# Altium PCB DSP大板子.PcbDoc (part 4 of 9)
Units mil, origin at the board's own origin, x right, y up, seen from the top; angles counter-clockwise.
Board outline 7874.02 x 9055.12 mil, 4 copper layers (Top Layer, GND02, PWR03, Bottom Layer), stack 23.756 mil thick; 656 components, 360 nets, 1967 pads, 2623 vias.
Unrouted connection lines stored in the file: 70.
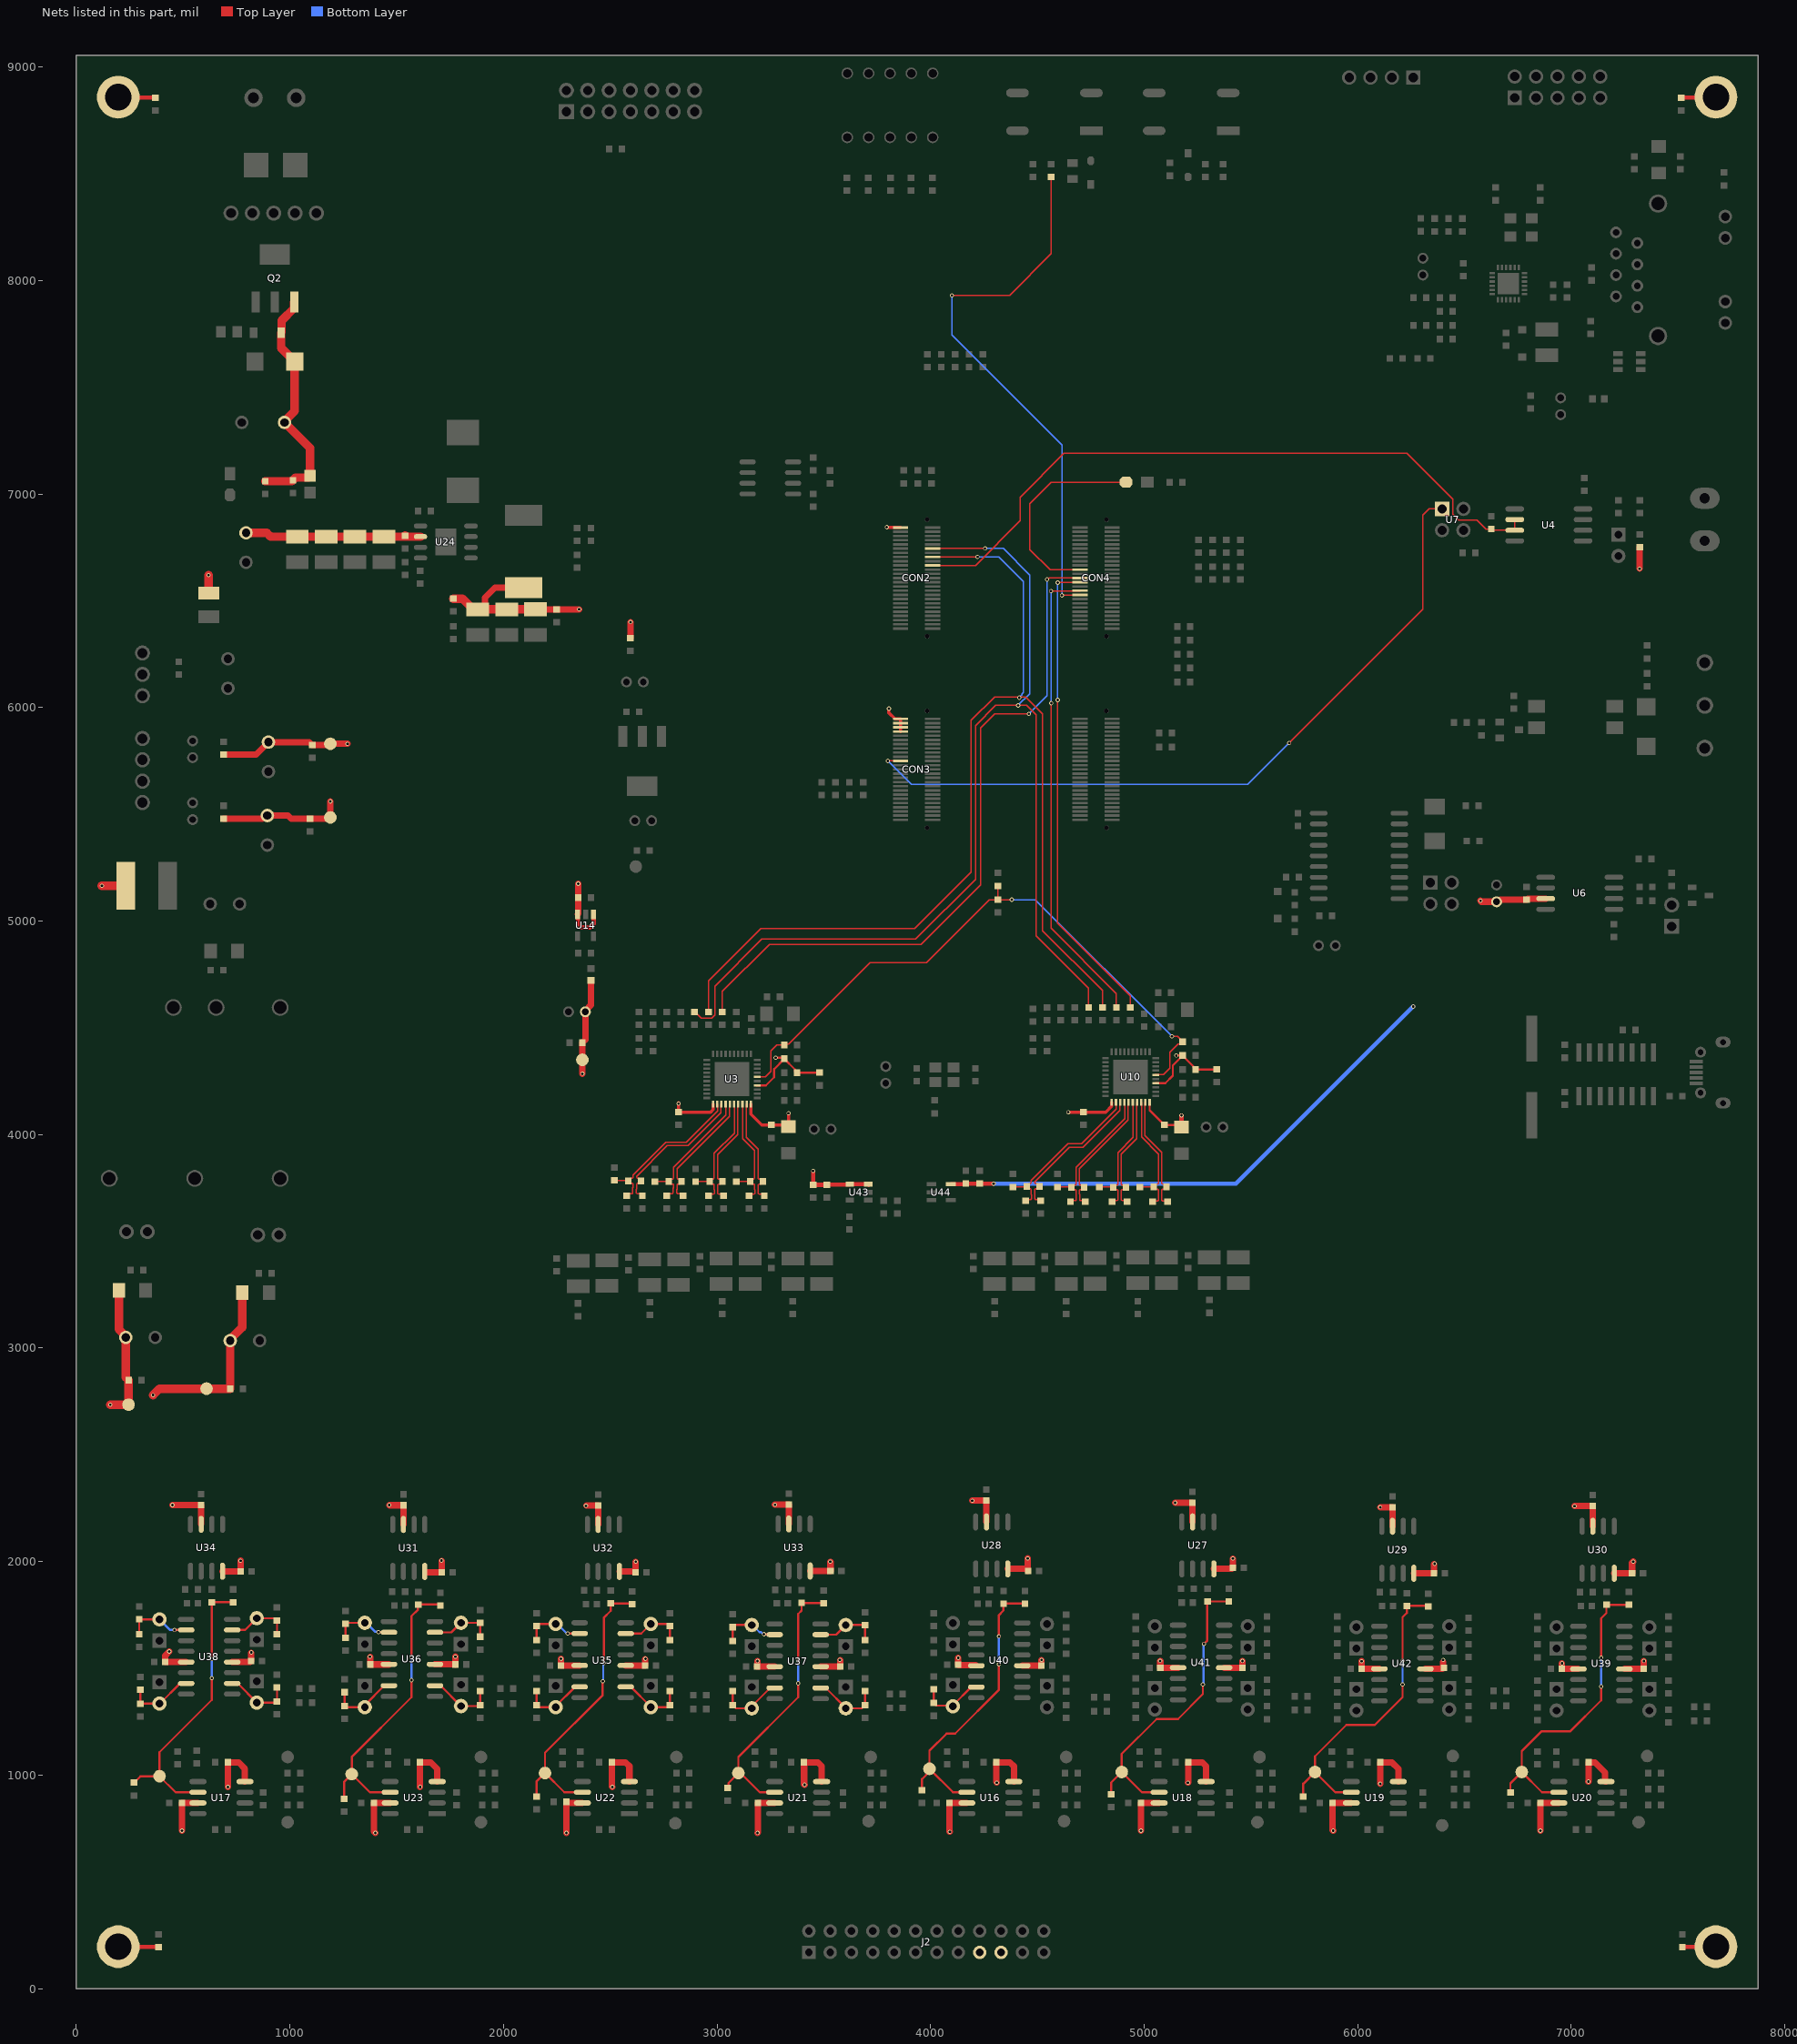
[diagram p4: the nets of this part, all layers, seen from the top]

## Part data (continued)
R1 R2 R3 R4 R5 R6 R7 R8 R9 R10 R11 R12 R13 R14 R15 R16 R17 R19 R20 R21 R22 R23 R25 R29 R30 R32 R33 R34 R35 R36 R37 R38 R (continued)
  R191: AddInBom=yes, DesignItemID=R, Device=R, FootprintName="R 0603_L", LibraryName="0.1 - 电阻-电容-电感", Origin Footprint="R 0201_L", OriginFootprint 2="R 0402_L", OriginFootprint 3="R 0805_L", OriginFootprint 4="R 1206_L", OriginFootprint 5="R 1210_L", OriginFootprint 6="R 1812_L", OriginFootprint 7="R 2010_L", OriginFootprint 8="R 2512_L", OriginFootprint 9="R 0201_M", OriginFootprint 10="R 0402_M", OriginFootprint 11="R 0603_M", OriginFootprint 12="R 0805_M", OriginFootprint 13="R 1206_M", OriginFootprint 14="R 1210_M", OriginFootprint 15="R 1812_M", OriginFootprint 16="R 2010_M", OriginFootprint 17="R 2512_M", OriginModelName="R 0603", SymbolName=R, UniqueId=e262797b4e338b99, 封装库来自淘宝卖家 ID：黄晶宝石=其他店铺购入均为盗版，不享受售后技术支持服务，请立即申请退款, 版权归属="来自淘宝 ID：黄晶宝石", 联系售后=https://shop463601444.taobao.com
  R192: AddInBom=yes, DesignItemID=R, Device=R, FootprintName="R 0603_L", LibraryName="0.1 - 电阻-电容-电感", Origin Footprint="R 0201_L", OriginFootprint 2="R 0402_L", OriginFootprint 3="R 0805_L", OriginFootprint 4="R 1206_L", OriginFootprint 5="R 1210_L", OriginFootprint 6="R 1812_L", OriginFootprint 7="R 2010_L", OriginFootprint 8="R 2512_L", OriginFootprint 9="R 0201_M", OriginFootprint 10="R 0402_M", OriginFootprint 11="R 0603_M", OriginFootprint 12="R 0805_M", OriginFootprint 13="R 1206_M", OriginFootprint 14="R 1210_M", OriginFootprint 15="R 1812_M", OriginFootprint 16="R 2010_M", OriginFootprint 17="R 2512_M", OriginModelName="R 0603", SymbolName=R, UniqueId=4edf9ccd7d55be5d, 封装库来自淘宝卖家 ID：黄晶宝石=其他店铺购入均为盗版，不享受售后技术支持服务，请立即申请退款, 版权归属="来自淘宝 ID：黄晶宝石", 联系售后=https://shop463601444.taobao.com
  R193: AddInBom=yes, DesignItemID=R, Device=R, FootprintName="R 0603_L", LibraryName="0.1 - 电阻-电容-电感", Origin Footprint="R 0201_L", OriginFootprint 2="R 0402_L", OriginFootprint 3="R 0805_L", OriginFootprint 4="R 1206_L", OriginFootprint 5="R 1210_L", OriginFootprint 6="R 1812_L", OriginFootprint 7="R 2010_L", OriginFootprint 8="R 2512_L", OriginFootprint 9="R 0201_M", OriginFootprint 10="R 0402_M", OriginFootprint 11="R 0603_M", OriginFootprint 12="R 0805_M", OriginFootprint 13="R 1206_M", OriginFootprint 14="R 1210_M", OriginFootprint 15="R 1812_M", OriginFootprint 16="R 2010_M", OriginFootprint 17="R 2512_M", OriginModelName="R 0603", SymbolName=R, UniqueId=9e0eccf13a6f31a8, 封装库来自淘宝卖家 ID：黄晶宝石=其他店铺购入均为盗版，不享受售后技术支持服务，请立即申请退款, 版权归属="来自淘宝 ID：黄晶宝石", 联系售后=https://shop463601444.taobao.com
  R194: AddInBom=yes, DesignItemID=R, Device=R, FootprintName="R 0603_L", LibraryName="0.1 - 电阻-电容-电感", Origin Footprint="R 0201_L", OriginFootprint 2="R 0402_L", OriginFootprint 3="R 0805_L", OriginFootprint 4="R 1206_L", OriginFootprint 5="R 1210_L", OriginFootprint 6="R 1812_L", OriginFootprint 7="R 2010_L", OriginFootprint 8="R 2512_L", OriginFootprint 9="R 0201_M", OriginFootprint 10="R 0402_M", OriginFootprint 11="R 0603_M", OriginFootprint 12="R 0805_M", OriginFootprint 13="R 1206_M", OriginFootprint 14="R 1210_M", OriginFootprint 15="R 1812_M", OriginFootprint 16="R 2010_M", OriginFootprint 17="R 2512_M", OriginModelName="R 0603", SymbolName=R, UniqueId=a6178234e12ca1a3, 封装库来自淘宝卖家 ID：黄晶宝石=其他店铺购入均为盗版，不享受售后技术支持服务，请立即申请退款, 版权归属="来自淘宝 ID：黄晶宝石", 联系售后=https://shop463601444.taobao.com
  R196: AddInBom=yes, DesignItemID=R, Device=R, FootprintName="R 0603_L", LibraryName="0.1 - 电阻-电容-电感", Origin Footprint="R 0201_L", OriginFootprint 2="R 0402_L", OriginFootprint 3="R 0805_L", OriginFootprint 4="R 1206_L", OriginFootprint 5="R 1210_L", OriginFootprint 6="R 1812_L", OriginFootprint 7="R 2010_L", OriginFootprint 8="R 2512_L", OriginFootprint 9="R 0201_M", OriginFootprint 10="R 0402_M", OriginFootprint 11="R 0603_M", OriginFootprint 12="R 0805_M", OriginFootprint 13="R 1206_M", OriginFootprint 14="R 1210_M", OriginFootprint 15="R 1812_M", OriginFootprint 16="R 2010_M", OriginFootprint 17="R 2512_M", OriginModelName="R 0603", SymbolName=R, UniqueId=09b823a69019dbbf, 封装库来自淘宝卖家 ID：黄晶宝石=其他店铺购入均为盗版，不享受售后技术支持服务，请立即申请退款, 版权归属="来自淘宝 ID：黄晶宝石", 联系售后=https://shop463601444.taobao.com
  R197: AddInBom=yes, DesignItemID=R, Device=R, FootprintName="R 0603_L", LibraryName="0.1 - 电阻-电容-电感", Origin Footprint="R 0201_L", OriginFootprint 2="R 0402_L", OriginFootprint 3="R 0805_L", OriginFootprint 4="R 1206_L", OriginFootprint 5="R 1210_L", OriginFootprint 6="R 1812_L", OriginFootprint 7="R 2010_L", OriginFootprint 8="R 2512_L", OriginFootprint 9="R 0201_M", OriginFootprint 10="R 0402_M", OriginFootprint 11="R 0603_M", OriginFootprint 12="R 0805_M", OriginFootprint 13="R 1206_M", OriginFootprint 14="R 1210_M", OriginFootprint 15="R 1812_M", OriginFootprint 16="R 2010_M", OriginFootprint 17="R 2512_M", OriginModelName="R 0603", SymbolName=R, UniqueId=bc27cb7a11a997be, 封装库来自淘宝卖家 ID：黄晶宝石=其他店铺购入均为盗版，不享受售后技术支持服务，请立即申请退款, 版权归属="来自淘宝 ID：黄晶宝石", 联系售后=https://shop463601444.taobao.com
  R198: AddInBom=yes, DesignItemID=R, Device=R, FootprintName="R 0603_L", LibraryName="0.1 - 电阻-电容-电感", Origin Footprint="R 0201_L", OriginFootprint 2="R 0402_L", OriginFootprint 3="R 0805_L", OriginFootprint 4="R 1206_L", OriginFootprint 5="R 1210_L", OriginFootprint 6="R 1812_L", OriginFootprint 7="R 2010_L", OriginFootprint 8="R 2512_L", OriginFootprint 9="R 0201_M", OriginFootprint 10="R 0402_M", OriginFootprint 11="R 0603_M", OriginFootprint 12="R 0805_M", OriginFootprint 13="R 1206_M", OriginFootprint 14="R 1210_M", OriginFootprint 15="R 1812_M", OriginFootprint 16="R 2010_M", OriginFootprint 17="R 2512_M", OriginModelName="R 0603", SymbolName=R, UniqueId=01fdb669dc90136a, 封装库来自淘宝卖家 ID：黄晶宝石=其他店铺购入均为盗版，不享受售后技术支持服务，请立即申请退款, 版权归属="来自淘宝 ID：黄晶宝石", 联系售后=https://shop463601444.taobao.com
  R199: AddInBom=yes, DesignItemID=R, Device=R, FootprintName="R 0603_L", LibraryName="0.1 - 电阻-电容-电感", Origin Footprint="R 0201_L", OriginFootprint 2="R 0402_L", OriginFootprint 3="R 0805_L", OriginFootprint 4="R 1206_L", OriginFootprint 5="R 1210_L", OriginFootprint 6="R 1812_L", OriginFootprint 7="R 2010_L", OriginFootprint 8="R 2512_L", OriginFootprint 9="R 0201_M", OriginFootprint 10="R 0402_M", OriginFootprint 11="R 0603_M", OriginFootprint 12="R 0805_M", OriginFootprint 13="R 1206_M", OriginFootprint 14="R 1210_M", OriginFootprint 15="R 1812_M", OriginFootprint 16="R 2010_M", OriginFootprint 17="R 2512_M", OriginModelName="R 0603", SymbolName=R, UniqueId=e4d4da7e660617df, 封装库来自淘宝卖家 ID：黄晶宝石=其他店铺购入均为盗版，不享受售后技术支持服务，请立即申请退款, 版权归属="来自淘宝 ID：黄晶宝石", 联系售后=https://shop463601444.taobao.com
  R201: AddInBom=yes, DesignItemID=R, Device=R, FootprintName="R 0603_L", LibraryName="0.1 - 电阻-电容-电感", Origin Footprint="R 0201_L", OriginFootprint 2="R 0402_L", OriginFootprint 3="R 0805_L", OriginFootprint 4="R 1206_L", OriginFootprint 5="R 1210_L", OriginFootprint 6="R 1812_L", OriginFootprint 7="R 2010_L", OriginFootprint 8="R 2512_L", OriginFootprint 9="R 0201_M", OriginFootprint 10="R 0402_M", OriginFootprint 11="R 0603_M", OriginFootprint 12="R 0805_M", OriginFootprint 13="R 1206_M", OriginFootprint 14="R 1210_M", OriginFootprint 15="R 1812_M", OriginFootprint 16="R 2010_M", OriginFootprint 17="R 2512_M", OriginModelName="R 0603", SymbolName=R, UniqueId=a6f8c12e5677218f, 封装库来自淘宝卖家 ID：黄晶宝石=其他店铺购入均为盗版，不享受售后技术支持服务，请立即申请退款, 版权归属="来自淘宝 ID：黄晶宝石", 联系售后=https://shop463601444.taobao.com
  R202: AddInBom=yes, DesignItemID=R, Device=R, FootprintName="R 0603_L", LibraryName="0.1 - 电阻-电容-电感", Origin Footprint="R 0201_L", OriginFootprint 2="R 0402_L", OriginFootprint 3="R 0805_L", OriginFootprint 4="R 1206_L", OriginFootprint 5="R 1210_L", OriginFootprint 6="R 1812_L", OriginFootprint 7="R 2010_L", OriginFootprint 8="R 2512_L", OriginFootprint 9="R 0201_M", OriginFootprint 10="R 0402_M", OriginFootprint 11="R 0603_M", OriginFootprint 12="R 0805_M", OriginFootprint 13="R 1206_M", OriginFootprint 14="R 1210_M", OriginFootprint 15="R 1812_M", OriginFootprint 16="R 2010_M", OriginFootprint 17="R 2512_M", OriginModelName="R 0603", SymbolName=R, UniqueId=da75effbc0c418b2, 封装库来自淘宝卖家 ID：黄晶宝石=其他店铺购入均为盗版，不享受售后技术支持服务，请立即申请退款, 版权归属="来自淘宝 ID：黄晶宝石", 联系售后=https://shop463601444.taobao.com
  R203: AddInBom=yes, DesignItemID=R, Device=R, FootprintName="R 0603_L", LibraryName="0.1 - 电阻-电容-电感", Origin Footprint="R 0201_L", OriginFootprint 2="R 0402_L", OriginFootprint 3="R 0805_L", OriginFootprint 4="R 1206_L", OriginFootprint 5="R 1210_L", OriginFootprint 6="R 1812_L", OriginFootprint 7="R 2010_L", OriginFootprint 8="R 2512_L", OriginFootprint 9="R 0201_M", OriginFootprint 10="R 0402_M", OriginFootprint 11="R 0603_M", OriginFootprint 12="R 0805_M", OriginFootprint 13="R 1206_M", OriginFootprint 14="R 1210_M", OriginFootprint 15="R 1812_M", OriginFootprint 16="R 2010_M", OriginFootprint 17="R 2512_M", OriginModelName="R 0603", SymbolName=R, UniqueId=41260ea8bae6dc8d, 封装库来自淘宝卖家 ID：黄晶宝石=其他店铺购入均为盗版，不享受售后技术支持服务，请立即申请退款, 版权归属="来自淘宝 ID：黄晶宝石", 联系售后=https://shop463601444.taobao.com
  R204: AddInBom=yes, DesignItemID=R, Device=R, FootprintName="R 0603_L", LibraryName="0.1 - 电阻-电容-电感", Origin Footprint="R 0201_L", OriginFootprint 2="R 0402_L", OriginFootprint 3="R 0805_L", OriginFootprint 4="R 1206_L", OriginFootprint 5="R 1210_L", OriginFootprint 6="R 1812_L", OriginFootprint 7="R 2010_L", OriginFootprint 8="R 2512_L", OriginFootprint 9="R 0201_M", OriginFootprint 10="R 0402_M", OriginFootprint 11="R 0603_M", OriginFootprint 12="R 0805_M", OriginFootprint 13="R 1206_M", OriginFootprint 14="R 1210_M", OriginFootprint 15="R 1812_M", OriginFootprint 16="R 2010_M", OriginFootprint 17="R 2512_M", OriginModelName="R 0603", SymbolName=R, UniqueId=df29ef2d077fcbbf, 封装库来自淘宝卖家 ID：黄晶宝石=其他店铺购入均为盗版，不享受售后技术支持服务，请立即申请退款, 版权归属="来自淘宝 ID：黄晶宝石", 联系售后=https://shop463601444.taobao.com
  R205: AddInBom=yes, DesignItemID=R, Device=R, FootprintName="R 0603_L", LibraryName="0.1 - 电阻-电容-电感", Origin Footprint="R 0201_L", OriginFootprint 2="R 0402_L", OriginFootprint 3="R 0805_L", OriginFootprint 4="R 1206_L", OriginFootprint 5="R 1210_L", OriginFootprint 6="R 1812_L", OriginFootprint 7="R 2010_L", OriginFootprint 8="R 2512_L", OriginFootprint 9="R 0201_M", OriginFootprint 10="R 0402_M", OriginFootprint 11="R 0603_M", OriginFootprint 12="R 0805_M", OriginFootprint 13="R 1206_M", OriginFootprint 14="R 1210_M", OriginFootprint 15="R 1812_M", OriginFootprint 16="R 2010_M", OriginFootprint 17="R 2512_M", OriginModelName="R 0603", SymbolName=R, UniqueId=e988a913e3416cdd, 封装库来自淘宝卖家 ID：黄晶宝石=其他店铺购入均为盗版，不享受售后技术支持服务，请立即申请退款, 版权归属="来自淘宝 ID：黄晶宝石", 联系售后=https://shop463601444.taobao.com
  R206: AddInBom=yes, DesignItemID=R, Device=R, FootprintName="R 0603_L", LibraryName="0.1 - 电阻-电容-电感", Origin Footprint="R 0201_L", OriginFootprint 2="R 0402_L", OriginFootprint 3="R 0805_L", OriginFootprint 4="R 1206_L", OriginFootprint 5="R 1210_L", OriginFootprint 6="R 1812_L", OriginFootprint 7="R 2010_L", OriginFootprint 8="R 2512_L", OriginFootprint 9="R 0201_M", OriginFootprint 10="R 0402_M", OriginFootprint 11="R 0603_M", OriginFootprint 12="R 0805_M", OriginFootprint 13="R 1206_M", OriginFootprint 14="R 1210_M", OriginFootprint 15="R 1812_M", OriginFootprint 16="R 2010_M", OriginFootprint 17="R 2512_M", OriginModelName="R 0603", SymbolName=R, UniqueId=a1dc1d7ffb4193e6, 封装库来自淘宝卖家 ID：黄晶宝石=其他店铺购入均为盗版，不享受售后技术支持服务，请立即申请退款, 版权归属="来自淘宝 ID：黄晶宝石", 联系售后=https://shop463601444.taobao.com
  R207: AddInBom=yes, DesignItemID=R, Device=R, FootprintName="R 0603_L", LibraryName="0.1 - 电阻-电容-电感", Origin Footprint="R 0201_L", OriginFootprint 2="R 0402_L", OriginFootprint 3="R 0805_L", OriginFootprint 4="R 1206_L", OriginFootprint 5="R 1210_L", OriginFootprint 6="R 1812_L", OriginFootprint 7="R 2010_L", OriginFootprint 8="R 2512_L", OriginFootprint 9="R 0201_M", OriginFootprint 10="R 0402_M", OriginFootprint 11="R 0603_M", OriginFootprint 12="R 0805_M", OriginFootprint 13="R 1206_M", OriginFootprint 14="R 1210_M", OriginFootprint 15="R 1812_M", OriginFootprint 16="R 2010_M", OriginFootprint 17="R 2512_M", OriginModelName="R 0603", SymbolName=R, UniqueId=94189e0415d5623f, 封装库来自淘宝卖家 ID：黄晶宝石=其他店铺购入均为盗版，不享受售后技术支持服务，请立即申请退款, 版权归属="来自淘宝 ID：黄晶宝石", 联系售后=https://shop463601444.taobao.com
  R208: AddInBom=yes, DesignItemID=R, Device=R, FootprintName="R 0603_L", LibraryName="0.1 - 电阻-电容-电感", Origin Footprint="R 0201_L", OriginFootprint 2="R 0402_L", OriginFootprint 3="R 0805_L", OriginFootprint 4="R 1206_L", OriginFootprint 5="R 1210_L", OriginFootprint 6="R 1812_L", OriginFootprint 7="R 2010_L", OriginFootprint 8="R 2512_L", OriginFootprint 9="R 0201_M", OriginFootprint 10="R 0402_M", OriginFootprint 11="R 0603_M", OriginFootprint 12="R 0805_M", OriginFootprint 13="R 1206_M", OriginFootprint 14="R 1210_M", OriginFootprint 15="R 1812_M", OriginFootprint 16="R 2010_M", OriginFootprint 17="R 2512_M", OriginModelName="R 0603", SymbolName=R, UniqueId=acf15e2cdf1c818f, 封装库来自淘宝卖家 ID：黄晶宝石=其他店铺购入均为盗版，不享受售后技术支持服务，请立即申请退款, 版权归属="来自淘宝 ID：黄晶宝石", 联系售后=https://shop463601444.taobao.com
  R209: AddInBom=yes, DesignItemID=R, Device=R, FootprintName="R 0603_L", LibraryName="0.1 - 电阻-电容-电感", Origin Footprint="R 0201_L", OriginFootprint 2="R 0402_L", OriginFootprint 3="R 0805_L", OriginFootprint 4="R 1206_L", OriginFootprint 5="R 1210_L", OriginFootprint 6="R 1812_L", OriginFootprint 7="R 2010_L", OriginFootprint 8="R 2512_L", OriginFootprint 9="R 0201_M", OriginFootprint 10="R 0402_M", OriginFootprint 11="R 0603_M", OriginFootprint 12="R 0805_M", OriginFootprint 13="R 1206_M", OriginFootprint 14="R 1210_M", OriginFootprint 15="R 1812_M", OriginFootprint 16="R 2010_M", OriginFootprint 17="R 2512_M", OriginModelName="R 0603", SymbolName=R, UniqueId=3520350cb8a16ddf, 封装库来自淘宝卖家 ID：黄晶宝石=其他店铺购入均为盗版，不享受售后技术支持服务，请立即申请退款, 版权归属="来自淘宝 ID：黄晶宝石", 联系售后=https://shop463601444.taobao.com
  R210: AddInBom=yes, DesignItemID=R, Device=R, FootprintName="R 0603_L", LibraryName="0.1 - 电阻-电容-电感", Origin Footprint="R 0201_L", OriginFootprint 2="R 0402_L", OriginFootprint 3="R 0805_L", OriginFootprint 4="R 1206_L", OriginFootprint 5="R 1210_L", OriginFootprint 6="R 1812_L", OriginFootprint 7="R 2010_L", OriginFootprint 8="R 2512_L", OriginFootprint 9="R 0201_M", OriginFootprint 10="R 0402_M", OriginFootprint 11="R 0603_M", OriginFootprint 12="R 0805_M", OriginFootprint 13="R 1206_M", OriginFootprint 14="R 1210_M", OriginFootprint 15="R 1812_M", OriginFootprint 16="R 2010_M", OriginFootprint 17="R 2512_M", OriginModelName="R 0603", SymbolName=R, UniqueId=ff64ea784eb901ab, 封装库来自淘宝卖家 ID：黄晶宝石=其他店铺购入均为盗版，不享受售后技术支持服务，请立即申请退款, 版权归属="来自淘宝 ID：黄晶宝石", 联系售后=https://shop463601444.taobao.com
  R211: AddInBom=yes, DesignItemID=R, Device=R, FootprintName="R 0603_L", LibraryName="0.1 - 电阻-电容-电感", Origin Footprint="R 0201_L", OriginFootprint 2="R 0402_L", OriginFootprint 3="R 0805_L", OriginFootprint 4="R 1206_L", OriginFootprint 5="R 1210_L", OriginFootprint 6="R 1812_L", OriginFootprint 7="R 2010_L", OriginFootprint 8="R 2512_L", OriginFootprint 9="R 0201_M", OriginFootprint 10="R 0402_M", OriginFootprint 11="R 0603_M", OriginFootprint 12="R 0805_M", OriginFootprint 13="R 1206_M", OriginFootprint 14="R 1210_M", OriginFootprint 15="R 1812_M", OriginFootprint 16="R 2010_M", OriginFootprint 17="R 2512_M", OriginModelName="R 0603", SymbolName=R, UniqueId=1887dacec97403d3, 封装库来自淘宝卖家 ID：黄晶宝石=其他店铺购入均为盗版，不享受售后技术支持服务，请立即申请退款, 版权归属="来自淘宝 ID：黄晶宝石", 联系售后=https://shop463601444.taobao.com
  R212: AddInBom=yes, DesignItemID=R, Device=R, FootprintName="R 0603_L", LibraryName="0.1 - 电阻-电容-电感", Origin Footprint="R 0201_L", OriginFootprint 2="R 0402_L", OriginFootprint 3="R 0805_L", OriginFootprint 4="R 1206_L", OriginFootprint 5="R 1210_L", OriginFootprint 6="R 1812_L", OriginFootprint 7="R 2010_L", OriginFootprint 8="R 2512_L", OriginFootprint 9="R 0201_M", OriginFootprint 10="R 0402_M", OriginFootprint 11="R 0603_M", OriginFootprint 12="R 0805_M", OriginFootprint 13="R 1206_M", OriginFootprint 14="R 1210_M", OriginFootprint 15="R 1812_M", OriginFootprint 16="R 2010_M", OriginFootprint 17="R 2512_M", OriginModelName="R 0603", SymbolName=R, UniqueId=90aa3c19b060f889, 封装库来自淘宝卖家 ID：黄晶宝石=其他店铺购入均为盗版，不享受售后技术支持服务，请立即申请退款, 版权归属="来自淘宝 ID：黄晶宝石", 联系售后=https://shop463601444.taobao.com
  R213: AddInBom=yes, DesignItemID=R, Device=R, FootprintName="R 0603_L", LibraryName="0.1 - 电阻-电容-电感", Origin Footprint="R 0201_L", OriginFootprint 2="R 0402_L", OriginFootprint 3="R 0805_L", OriginFootprint 4="R 1206_L", OriginFootprint 5="R 1210_L", OriginFootprint 6="R 1812_L", OriginFootprint 7="R 2010_L", OriginFootprint 8="R 2512_L", OriginFootprint 9="R 0201_M", OriginFootprint 10="R 0402_M", OriginFootprint 11="R 0603_M", OriginFootprint 12="R 0805_M", OriginFootprint 13="R 1206_M", OriginFootprint 14="R 1210_M", OriginFootprint 15="R 1812_M", OriginFootprint 16="R 2010_M", OriginFootprint 17="R 2512_M", OriginModelName="R 0603", SymbolName=R, UniqueId=28145adf450505d9, 封装库来自淘宝卖家 ID：黄晶宝石=其他店铺购入均为盗版，不享受售后技术支持服务，请立即申请退款, 版权归属="来自淘宝 ID：黄晶宝石", 联系售后=https://shop463601444.taobao.com
  R214: AddInBom=yes, DesignItemID=R, Device=R, FootprintName="R 0603_L", LibraryName="0.1 - 电阻-电容-电感", Origin Footprint="R 0201_L", OriginFootprint 2="R 0402_L", OriginFootprint 3="R 0805_L", OriginFootprint 4="R 1206_L", OriginFootprint 5="R 1210_L", OriginFootprint 6="R 1812_L", OriginFootprint 7="R 2010_L", OriginFootprint 8="R 2512_L", OriginFootprint 9="R 0201_M", OriginFootprint 10="R 0402_M", OriginFootprint 11="R 0603_M", OriginFootprint 12="R 0805_M", OriginFootprint 13="R 1206_M", OriginFootprint 14="R 1210_M", OriginFootprint 15="R 1812_M", OriginFootprint 16="R 2010_M", OriginFootprint 17="R 2512_M", OriginModelName="R 0603", SymbolName=R, UniqueId=6a81be30a454b297, 封装库来自淘宝卖家 ID：黄晶宝石=其他店铺购入均为盗版，不享受售后技术支持服务，请立即申请退款, 版权归属="来自淘宝 ID：黄晶宝石", 联系售后=https://shop463601444.taobao.com
  R215: AddInBom=yes, DesignItemID=R, Device=R, FootprintName="R 0603_L", LibraryName="0.1 - 电阻-电容-电感", Origin Footprint="R 0201_L", OriginFootprint 2="R 0402_L", OriginFootprint 3="R 0805_L", OriginFootprint 4="R 1206_L", OriginFootprint 5="R 1210_L", OriginFootprint 6="R 1812_L", OriginFootprint 7="R 2010_L", OriginFootprint 8="R 2512_L", OriginFootprint 9="R 0201_M", OriginFootprint 10="R 0402_M", OriginFootprint 11="R 0603_M", OriginFootprint 12="R 0805_M", OriginFootprint 13="R 1206_M", OriginFootprint 14="R 1210_M", OriginFootprint 15="R 1812_M", OriginFootprint 16="R 2010_M", OriginFootprint 17="R 2512_M", OriginModelName="R 0603", SymbolName=R, UniqueId=50053c9146ba4240, 封装库来自淘宝卖家 ID：黄晶宝石=其他店铺购入均为盗版，不享受售后技术支持服务，请立即申请退款, 版权归属="来自淘宝 ID：黄晶宝石", 联系售后=https://shop463601444.taobao.com
  R216: AddInBom=yes, DesignItemID=R, Device=R, FootprintName="R 0603_L", LibraryName="0.1 - 电阻-电容-电感", Origin Footprint="R 0201_L", OriginFootprint 2="R 0402_L", OriginFootprint 3="R 0805_L", OriginFootprint 4="R 1206_L", OriginFootprint 5="R 1210_L", OriginFootprint 6="R 1812_L", OriginFootprint 7="R 2010_L", OriginFootprint 8="R 2512_L", OriginFootprint 9="R 0201_M", OriginFootprint 10="R 0402_M", OriginFootprint 11="R 0603_M", OriginFootprint 12="R 0805_M", OriginFootprint 13="R 1206_M", OriginFootprint 14="R 1210_M", OriginFootprint 15="R 1812_M", OriginFootprint 16="R 2010_M", OriginFootprint 17="R 2512_M", OriginModelName="R 0603", SymbolName=R, UniqueId=55d3b7675eee0b5f, 封装库来自淘宝卖家 ID：黄晶宝石=其他店铺购入均为盗版，不享受售后技术支持服务，请立即申请退款, 版权归属="来自淘宝 ID：黄晶宝石", 联系售后=https://shop463601444.taobao.com
  R217: AddInBom=yes, DesignItemID=R, Device=R, FootprintName="R 0603_L", LibraryName="0.1 - 电阻-电容-电感", Origin Footprint="R 0201_L", OriginFootprint 2="R 0402_L", OriginFootprint 3="R 0805_L", OriginFootprint 4="R 1206_L", OriginFootprint 5="R 1210_L", OriginFootprint 6="R 1812_L", OriginFootprint 7="R 2010_L", OriginFootprint 8="R 2512_L", OriginFootprint 9="R 0201_M", OriginFootprint 10="R 0402_M", OriginFootprint 11="R 0603_M", OriginFootprint 12="R 0805_M", OriginFootprint 13="R 1206_M", OriginFootprint 14="R 1210_M", OriginFootprint 15="R 1812_M", OriginFootprint 16="R 2010_M", OriginFootprint 17="R 2512_M", OriginModelName="R 0603", SymbolName=R, UniqueId=356270ea20700a9c, 封装库来自淘宝卖家 ID：黄晶宝石=其他店铺购入均为盗版，不享受售后技术支持服务，请立即申请退款, 版权归属="来自淘宝 ID：黄晶宝石", 联系售后=https://shop463601444.taobao.com
  R218: AddInBom=yes, DesignItemID=R, Device=R, FootprintName="R 0603_L", LibraryName="0.1 - 电阻-电容-电感", Origin Footprint="R 0201_L", OriginFootprint 2="R 0402_L", OriginFootprint 3="R 0805_L", OriginFootprint 4="R 1206_L", OriginFootprint 5="R 1210_L", OriginFootprint 6="R 1812_L", OriginFootprint 7="R 2010_L", OriginFootprint 8="R 2512_L", OriginFootprint 9="R 0201_M", OriginFootprint 10="R 0402_M", OriginFootprint 11="R 0603_M", OriginFootprint 12="R 0805_M", OriginFootprint 13="R 1206_M", OriginFootprint 14="R 1210_M", OriginFootprint 15="R 1812_M", OriginFootprint 16="R 2010_M", OriginFootprint 17="R 2512_M", OriginModelName="R 0603", SymbolName=R, UniqueId=0bc07fc535f36e79, 封装库来自淘宝卖家 ID：黄晶宝石=其他店铺购入均为盗版，不享受售后技术支持服务，请立即申请退款, 版权归属="来自淘宝 ID：黄晶宝石", 联系售后=https://shop463601444.taobao.com
  R219: AddInBom=yes, DesignItemID=R, Device=R, FootprintName="R 0603_L", LibraryName="0.1 - 电阻-电容-电感", Origin Footprint="R 0201_L", OriginFootprint 2="R 0402_L", OriginFootprint 3="R 0805_L", OriginFootprint 4="R 1206_L", OriginFootprint 5="R 1210_L", OriginFootprint 6="R 1812_L", OriginFootprint 7="R 2010_L", OriginFootprint 8="R 2512_L", OriginFootprint 9="R 0201_M", OriginFootprint 10="R 0402_M", OriginFootprint 11="R 0603_M", OriginFootprint 12="R 0805_M", OriginFootprint 13="R 1206_M", OriginFootprint 14="R 1210_M", OriginFootprint 15="R 1812_M", OriginFootprint 16="R 2010_M", OriginFootprint 17="R 2512_M", OriginModelName="R 0603", SymbolName=R, UniqueId=4df6a426e202bc68, 封装库来自淘宝卖家 ID：黄晶宝石=其他店铺购入均为盗版，不享受售后技术支持服务，请立即申请退款, 版权归属="来自淘宝 ID：黄晶宝石", 联系售后=https://shop463601444.taobao.com
  R220: AddInBom=yes, DesignItemID=R, Device=R, FootprintName="R 0603_L", LibraryName="0.1 - 电阻-电容-电感", Origin Footprint="R 0201_L", OriginFootprint 2="R 0402_L", OriginFootprint 3="R 0805_L", OriginFootprint 4="R 1206_L", OriginFootprint 5="R 1210_L", OriginFootprint 6="R 1812_L", OriginFootprint 7="R 2010_L", OriginFootprint 8="R 2512_L", OriginFootprint 9="R 0201_M", OriginFootprint 10="R 0402_M", OriginFootprint 11="R 0603_M", OriginFootprint 12="R 0805_M", OriginFootprint 13="R 1206_M", OriginFootprint 14="R 1210_M", OriginFootprint 15="R 1812_M", OriginFootprint 16="R 2010_M", OriginFootprint 17="R 2512_M", OriginModelName="R 0603", SymbolName=R, UniqueId=b62d5738e8aadfe3, 封装库来自淘宝卖家 ID：黄晶宝石=其他店铺购入均为盗版，不享受售后技术支持服务，请立即申请退款, 版权归属="来自淘宝 ID：黄晶宝石", 联系售后=https://shop463601444.taobao.com
  R221: AddInBom=yes, DesignItemID=R, Device=R, FootprintName="R 0603_L", LibraryName="0.1 - 电阻-电容-电感", Origin Footprint="R 0201_L", OriginFootprint 2="R 0402_L", OriginFootprint 3="R 0805_L", OriginFootprint 4="R 1206_L", OriginFootprint 5="R 1210_L", OriginFootprint 6="R 1812_L", OriginFootprint 7="R 2010_L", OriginFootprint 8="R 2512_L", OriginFootprint 9="R 0201_M", OriginFootprint 10="R 0402_M", OriginFootprint 11="R 0603_M", OriginFootprint 12="R 0805_M", OriginFootprint 13="R 1206_M", OriginFootprint 14="R 1210_M", OriginFootprint 15="R 1812_M", OriginFootprint 16="R 2010_M", OriginFootprint 17="R 2512_M", OriginModelName="R 0603", SymbolName=R, UniqueId=f6a722bea999a1f8, 封装库来自淘宝卖家 ID：黄晶宝石=其他店铺购入均为盗版，不享受售后技术支持服务，请立即申请退款, 版权归属="来自淘宝 ID：黄晶宝石", 联系售后=https://shop463601444.taobao.com
  R222: AddInBom=yes, DesignItemID=R, Device=R, FootprintName="R 0603_L", LibraryName="0.1 - 电阻-电容-电感", Origin Footprint="R 0201_L", OriginFootprint 2="R 0402_L", OriginFootprint 3="R 0805_L", OriginFootprint 4="R 1206_L", OriginFootprint 5="R 1210_L", OriginFootprint 6="R 1812_L", OriginFootprint 7="R 2010_L", OriginFootprint 8="R 2512_L", OriginFootprint 9="R 0201_M", OriginFootprint 10="R 0402_M", OriginFootprint 11="R 0603_M", OriginFootprint 12="R 0805_M", OriginFootprint 13="R 1206_M", OriginFootprint 14="R 1210_M", OriginFootprint 15="R 1812_M", OriginFootprint 16="R 2010_M", OriginFootprint 17="R 2512_M", OriginModelName="R 0603", SymbolName=R, UniqueId=85b67f9d76b2e874, 封装库来自淘宝卖家 ID：黄晶宝石=其他店铺购入均为盗版，不享受售后技术支持服务，请立即申请退款, 版权归属="来自淘宝 ID：黄晶宝石", 联系售后=https://shop463601444.taobao.com
  R223: AddInBom=yes, DesignItemID=R, Device=R, FootprintName="R 0603_L", LibraryName="0.1 - 电阻-电容-电感", Origin Footprint="R 0201_L", OriginFootprint 2="R 0402_L", OriginFootprint 3="R 0805_L", OriginFootprint 4="R 1206_L", OriginFootprint 5="R 1210_L", OriginFootprint 6="R 1812_L", OriginFootprint 7="R 2010_L", OriginFootprint 8="R 2512_L", OriginFootprint 9="R 0201_M", OriginFootprint 10="R 0402_M", OriginFootprint 11="R 0603_M", OriginFootprint 12="R 0805_M", OriginFootprint 13="R 1206_M", OriginFootprint 14="R 1210_M", OriginFootprint 15="R 1812_M", OriginFootprint 16="R 2010_M", OriginFootprint 17="R 2512_M", OriginModelName="R 0603", SymbolName=R, UniqueId=e0ee0f05e2f0b4da, 封装库来自淘宝卖家 ID：黄晶宝石=其他店铺购入均为盗版，不享受售后技术支持服务，请立即申请退款, 版权归属="来自淘宝 ID：黄晶宝石", 联系售后=https://shop463601444.taobao.com
  R224: AddInBom=yes, DesignItemID=R, Device=R, FootprintName="R 0603_L", LibraryName="0.1 - 电阻-电容-电感", Origin Footprint="R 0201_L", OriginFootprint 2="R 0402_L", OriginFootprint 3="R 0805_L", OriginFootprint 4="R 1206_L", OriginFootprint 5="R 1210_L", OriginFootprint 6="R 1812_L", OriginFootprint 7="R 2010_L", OriginFootprint 8="R 2512_L", OriginFootprint 9="R 0201_M", OriginFootprint 10="R 0402_M", OriginFootprint 11="R 0603_M", OriginFootprint 12="R 0805_M", OriginFootprint 13="R 1206_M", OriginFootprint 14="R 1210_M", OriginFootprint 15="R 1812_M", OriginFootprint 16="R 2010_M", OriginFootprint 17="R 2512_M", OriginModelName="R 0603", SymbolName=R, UniqueId=3fbbebc0b09736fe, 封装库来自淘宝卖家 ID：黄晶宝石=其他店铺购入均为盗版，不享受售后技术支持服务，请立即申请退款, 版权归属="来自淘宝 ID：黄晶宝石", 联系售后=https://shop463601444.taobao.com
  R225: AddInBom=yes, DesignItemID=R, Device=R, FootprintName="R 0603_L", LibraryName="0.1 - 电阻-电容-电感", Origin Footprint="R 0201_L", OriginFootprint 2="R 0402_L", OriginFootprint 3="R 0805_L", OriginFootprint 4="R 1206_L", OriginFootprint 5="R 1210_L", OriginFootprint 6="R 1812_L", OriginFootprint 7="R 2010_L", OriginFootprint 8="R 2512_L", OriginFootprint 9="R 0201_M", OriginFootprint 10="R 0402_M", OriginFootprint 11="R 0603_M", OriginFootprint 12="R 0805_M", OriginFootprint 13="R 1206_M", OriginFootprint 14="R 1210_M", OriginFootprint 15="R 1812_M", OriginFootprint 16="R 2010_M", OriginFootprint 17="R 2512_M", OriginModelName="R 0603", SymbolName=R, UniqueId=1ad54b734ffff27e, 封装库来自淘宝卖家 ID：黄晶宝石=其他店铺购入均为盗版，不享受售后技术支持服务，请立即申请退款, 版权归属="来自淘宝 ID：黄晶宝石", 联系售后=https://shop463601444.taobao.com
  R226: AddInBom=yes, DesignItemID=R, Device=R, FootprintName="R 0603_L", LibraryName="0.1 - 电阻-电容-电感", Origin Footprint="R 0201_L", OriginFootprint 2="R 0402_L", OriginFootprint 3="R 0805_L", OriginFootprint 4="R 1206_L", OriginFootprint 5="R 1210_L", OriginFootprint 6="R 1812_L", OriginFootprint 7="R 2010_L", OriginFootprint 8="R 2512_L", OriginFootprint 9="R 0201_M", OriginFootprint 10="R 0402_M", OriginFootprint 11="R 0603_M", OriginFootprint 12="R 0805_M", OriginFootprint 13="R 1206_M", OriginFootprint 14="R 1210_M", OriginFootprint 15="R 1812_M", OriginFootprint 16="R 2010_M", OriginFootprint 17="R 2512_M", OriginModelName="R 0603", SymbolName=R, UniqueId=1733e0132aa39ad1, 封装库来自淘宝卖家 ID：黄晶宝石=其他店铺购入均为盗版，不享受售后技术支持服务，请立即申请退款, 版权归属="来自淘宝 ID：黄晶宝石", 联系售后=https://shop463601444.taobao.com
  R227: AddInBom=yes, DesignItemID=R, Device=R, FootprintName="R 0603_L", LibraryName="0.1 - 电阻-电容-电感", Origin Footprint="R 0201_L", OriginFootprint 2="R 0402_L", OriginFootprint 3="R 0805_L", OriginFootprint 4="R 1206_L", OriginFootprint 5="R 1210_L", OriginFootprint 6="R 1812_L", OriginFootprint 7="R 2010_L", OriginFootprint 8="R 2512_L", OriginFootprint 9="R 0201_M", OriginFootprint 10="R 0402_M", OriginFootprint 11="R 0603_M", OriginFootprint 12="R 0805_M", OriginFootprint 13="R 1206_M", OriginFootprint 14="R 1210_M", OriginFootprint 15="R 1812_M", OriginFootprint 16="R 2010_M", OriginFootprint 17="R 2512_M", OriginModelName="R 0603", SymbolName=R, UniqueId=e174b74f1d9ac547, 封装库来自淘宝卖家 ID：黄晶宝石=其他店铺购入均为盗版，不享受售后技术支持服务，请立即申请退款, 版权归属="来自淘宝 ID：黄晶宝石", 联系售后=https://shop463601444.taobao.com
  R228: AddInBom=yes, DesignItemID=R, Device=R, FootprintName="R 0603_L", LibraryName="0.1 - 电阻-电容-电感", Origin Footprint="R 0201_L", OriginFootprint 2="R 0402_L", OriginFootprint 3="R 0805_L", OriginFootprint 4="R 1206_L", OriginFootprint 5="R 1210_L", OriginFootprint 6="R 1812_L", OriginFootprint 7="R 2010_L", OriginFootprint 8="R 2512_L", OriginFootprint 9="R 0201_M", OriginFootprint 10="R 0402_M", OriginFootprint 11="R 0603_M", OriginFootprint 12="R 0805_M", OriginFootprint 13="R 1206_M", OriginFootprint 14="R 1210_M", OriginFootprint 15="R 1812_M", OriginFootprint 16="R 2010_M", OriginFootprint 17="R 2512_M", OriginModelName="R 0603", SymbolName=R, UniqueId=c6a558d5d37ead57, 封装库来自淘宝卖家 ID：黄晶宝石=其他店铺购入均为盗版，不享受售后技术支持服务，请立即申请退款, 版权归属="来自淘宝 ID：黄晶宝石", 联系售后=https://shop463601444.taobao.com
  R230: AddInBom=yes, DesignItemID=R, Device=R, FootprintName="R 0603_L", LibraryName="0.1 - 电阻-电容-电感", Origin Footprint="R 0201_L", OriginFootprint 2="R 0402_L", OriginFootprint 3="R 0805_L", OriginFootprint 4="R 1206_L", OriginFootprint 5="R 1210_L", OriginFootprint 6="R 1812_L", OriginFootprint 7="R 2010_L", OriginFootprint 8="R 2512_L", OriginFootprint 9="R 0201_M", OriginFootprint 10="R 0402_M", OriginFootprint 11="R 0603_M", OriginFootprint 12="R 0805_M", OriginFootprint 13="R 1206_M", OriginFootprint 14="R 1210_M", OriginFootprint 15="R 1812_M", OriginFootprint 16="R 2010_M", OriginFootprint 17="R 2512_M", OriginModelName="R 0603", SymbolName=R, UniqueId=d9f908b8ca857374, 封装库来自淘宝卖家 ID：黄晶宝石=其他店铺购入均为盗版，不享受售后技术支持服务，请立即申请退款, 版权归属="来自淘宝 ID：黄晶宝石", 联系售后=https://shop463601444.taobao.com
  R231: AddInBom=yes, DesignItemID=R, Device=R, FootprintName="R 0603_L", LibraryName="0.1 - 电阻-电容-电感", Origin Footprint="R 0201_L", OriginFootprint 2="R 0402_L", OriginFootprint 3="R 0805_L", OriginFootprint 4="R 1206_L", OriginFootprint 5="R 1210_L", OriginFootprint 6="R 1812_L", OriginFootprint 7="R 2010_L", OriginFootprint 8="R 2512_L", OriginFootprint 9="R 0201_M", OriginFootprint 10="R 0402_M", OriginFootprint 11="R 0603_M", OriginFootprint 12="R 0805_M", OriginFootprint 13="R 1206_M", OriginFootprint 14="R 1210_M", OriginFootprint 15="R 1812_M", OriginFootprint 16="R 2010_M", OriginFootprint 17="R 2512_M", OriginModelName="R 0603", SymbolName=R, UniqueId=2aff7b51dc10ad2a, 封装库来自淘宝卖家 ID：黄晶宝石=其他店铺购入均为盗版，不享受售后技术支持服务，请立即申请退款, 版权归属="来自淘宝 ID：黄晶宝石", 联系售后=https://shop463601444.taobao.com
  R233: AddInBom=yes, DesignItemID=R, Device=R, FootprintName="R 0603_L", LibraryName="0.1 - 电阻-电容-电感", Origin Footprint="R 0201_L", OriginFootprint 2="R 0402_L", OriginFootprint 3="R 0805_L", OriginFootprint 4="R 1206_L", OriginFootprint 5="R 1210_L", OriginFootprint 6="R 1812_L", OriginFootprint 7="R 2010_L", OriginFootprint 8="R 2512_L", OriginFootprint 9="R 0201_M", OriginFootprint 10="R 0402_M", OriginFootprint 11="R 0603_M", OriginFootprint 12="R 0805_M", OriginFootprint 13="R 1206_M", OriginFootprint 14="R 1210_M", OriginFootprint 15="R 1812_M", OriginFootprint 16="R 2010_M", OriginFootprint 17="R 2512_M", OriginModelName="R 0603", SymbolName=R, UniqueId=5dfbcaad1eafe703, 封装库来自淘宝卖家 ID：黄晶宝石=其他店铺购入均为盗版，不享受售后技术支持服务，请立即申请退款, 版权归属="来自淘宝 ID：黄晶宝石", 联系售后=https://shop463601444.taobao.com
  R234: AddInBom=yes, DesignItemID=R, Device=R, FootprintName="R 0603_L", LibraryName="0.1 - 电阻-电容-电感", Origin Footprint="R 0201_L", OriginFootprint 2="R 0402_L", OriginFootprint 3="R 0805_L", OriginFootprint 4="R 1206_L", OriginFootprint 5="R 1210_L", OriginFootprint 6="R 1812_L", OriginFootprint 7="R 2010_L", OriginFootprint 8="R 2512_L", OriginFootprint 9="R 0201_M", OriginFootprint 10="R 0402_M", OriginFootprint 11="R 0603_M", OriginFootprint 12="R 0805_M", OriginFootprint 13="R 1206_M", OriginFootprint 14="R 1210_M", OriginFootprint 15="R 1812_M", OriginFootprint 16="R 2010_M", OriginFootprint 17="R 2512_M", OriginModelName="R 0603", SymbolName=R, UniqueId=bf789344b0fac116, 封装库来自淘宝卖家 ID：黄晶宝石=其他店铺购入均为盗版，不享受售后技术支持服务，请立即申请退款, 版权归属="来自淘宝 ID：黄晶宝石", 联系售后=https://shop463601444.taobao.com
  R240: AddInBom=yes, DesignItemID=R, Device=R, FootprintName="R 0603_L", LibraryName="0.1 - 电阻-电容-电感", Origin Footprint="R 0201_L", OriginFootprint 2="R 0402_L", OriginFootprint 3="R 0805_L", OriginFootprint 4="R 1206_L", OriginFootprint 5="R 1210_L", OriginFootprint 6="R 1812_L", OriginFootprint 7="R 2010_L", OriginFootprint 8="R 2512_L", OriginFootprint 9="R 0201_M", OriginFootprint 10="R 0402_M", OriginFootprint 11="R 0603_M", OriginFootprint 12="R 0805_M", OriginFootprint 13="R 1206_M", OriginFootprint 14="R 1210_M", OriginFootprint 15="R 1812_M", OriginFootprint 16="R 2010_M", OriginFootprint 17="R 2512_M", OriginModelName="R 0603", SymbolName=R, UniqueId=d3271885c7b6eafc, 封装库来自淘宝卖家 ID：黄晶宝石=其他店铺购入均为盗版，不享受售后技术支持服务，请立即申请退款, 版权归属="来自淘宝 ID：黄晶宝石", 联系售后=https://shop463601444.taobao.com
  R241: AddInBom=yes, DesignItemID=R, Device=R, FootprintName="R 0603_L", LibraryName="0.1 - 电阻-电容-电感", Origin Footprint="R 0201_L", OriginFootprint 2="R 0402_L", OriginFootprint 3="R 0805_L", OriginFootprint 4="R 1206_L", OriginFootprint 5="R 1210_L", OriginFootprint 6="R 1812_L", OriginFootprint 7="R 2010_L", OriginFootprint 8="R 2512_L", OriginFootprint 9="R 0201_M", OriginFootprint 10="R 0402_M", OriginFootprint 11="R 0603_M", OriginFootprint 12="R 0805_M", OriginFootprint 13="R 1206_M", OriginFootprint 14="R 1210_M", OriginFootprint 15="R 1812_M", OriginFootprint 16="R 2010_M", OriginFootprint 17="R 2512_M", OriginModelName="R 0603", SymbolName=R, UniqueId=81023e11c17a14a6, 封装库来自淘宝卖家 ID：黄晶宝石=其他店铺购入均为盗版，不享受售后技术支持服务，请立即申请退款, 版权归属="来自淘宝 ID：黄晶宝石", 联系售后=https://shop463601444.taobao.com
  R243: AddInBom=yes, DesignItemID=R, Device=R, FootprintName="R 0603_L", LibraryName="0.1 - 电阻-电容-电感", Origin Footprint="R 0201_L", OriginFootprint 2="R 0402_L", OriginFootprint 3="R 0805_L", OriginFootprint 4="R 1206_L", OriginFootprint 5="R 1210_L", OriginFootprint 6="R 1812_L", OriginFootprint 7="R 2010_L", OriginFootprint 8="R 2512_L", OriginFootprint 9="R 0201_M", OriginFootprint 10="R 0402_M", OriginFootprint 11="R 0603_M", OriginFootprint 12="R 0805_M", OriginFootprint 13="R 1206_M", OriginFootprint 14="R 1210_M", OriginFootprint 15="R 1812_M", OriginFootprint 16="R 2010_M", OriginFootprint 17="R 2512_M", OriginModelName="R 0603", SymbolName=R, UniqueId=a074999702fa02e6, 封装库来自淘宝卖家 ID：黄晶宝石=其他店铺购入均为盗版，不享受售后技术支持服务，请立即申请退款, 版权归属="来自淘宝 ID：黄晶宝石", 联系售后=https://shop463601444.taobao.com
  R244: AddInBom=yes, DesignItemID=R, Device=R, FootprintName="R 0603_L", LibraryName="0.1 - 电阻-电容-电感", Origin Footprint="R 0201_L", OriginFootprint 2="R 0402_L", OriginFootprint 3="R 0805_L", OriginFootprint 4="R 1206_L", OriginFootprint 5="R 1210_L", OriginFootprint 6="R 1812_L", OriginFootprint 7="R 2010_L", OriginFootprint 8="R 2512_L", OriginFootprint 9="R 0201_M", OriginFootprint 10="R 0402_M", OriginFootprint 11="R 0603_M", OriginFootprint 12="R 0805_M", OriginFootprint 13="R 1206_M", OriginFootprint 14="R 1210_M", OriginFootprint 15="R 1812_M", OriginFootprint 16="R 2010_M", OriginFootprint 17="R 2512_M", OriginModelName="R 0603", SymbolName=R, UniqueId=f8fa280bb9d4afdb, 封装库来自淘宝卖家 ID：黄晶宝石=其他店铺购入均为盗版，不享受售后技术支持服务，请立即申请退款, 版权归属="来自淘宝 ID：黄晶宝石", 联系售后=https://shop463601444.taobao.com
  R245: AddInBom=yes, DesignItemID=R, Device=R, FootprintName="R 0603_L", LibraryName="0.1 - 电阻-电容-电感", Origin Footprint="R 0201_L", OriginFootprint 2="R 0402_L", OriginFootprint 3="R 0805_L", OriginFootprint 4="R 1206_L", OriginFootprint 5="R 1210_L", OriginFootprint 6="R 1812_L", OriginFootprint 7="R 2010_L", OriginFootprint 8="R 2512_L", OriginFootprint 9="R 0201_M", OriginFootprint 10="R 0402_M", OriginFootprint 11="R 0603_M", OriginFootprint 12="R 0805_M", OriginFootprint 13="R 1206_M", OriginFootprint 14="R 1210_M", OriginFootprint 15="R 1812_M", OriginFootprint 16="R 2010_M", OriginFootprint 17="R 2512_M", OriginModelName="R 0603", SymbolName=R, UniqueId=780e728bcbe3c478, 封装库来自淘宝卖家 ID：黄晶宝石=其他店铺购入均为盗版，不享受售后技术支持服务，请立即申请退款, 版权归属="来自淘宝 ID：黄晶宝石", 联系售后=https://shop463601444.taobao.com
  R247: AddInBom=yes, DesignItemID=R, Device=R, FootprintName="R 0603_L", LibraryName="0.1 - 电阻-电容-电感", Origin Footprint="R 0201_L", OriginFootprint 2="R 0402_L", OriginFootprint 3="R 0805_L", OriginFootprint 4="R 1206_L", OriginFootprint 5="R 1210_L", OriginFootprint 6="R 1812_L", OriginFootprint 7="R 2010_L", OriginFootprint 8="R 2512_L", OriginFootprint 9="R 0201_M", OriginFootprint 10="R 0402_M", OriginFootprint 11="R 0603_M", OriginFootprint 12="R 0805_M", OriginFootprint 13="R 1206_M", OriginFootprint 14="R 1210_M", OriginFootprint 15="R 1812_M", OriginFootprint 16="R 2010_M", OriginFootprint 17="R 2512_M", OriginModelName="R 0603", SymbolName=R, UniqueId=61aee2c7162d13e5, 封装库来自淘宝卖家 ID：黄晶宝石=其他店铺购入均为盗版，不享受售后技术支持服务，请立即申请退款, 版权归属="来自淘宝 ID：黄晶宝石", 联系售后=https://shop463601444.taobao.com
  R249: AddInBom=yes, DesignItemID=R, Device=R, FootprintName="R 0603_L", LibraryName="0.1 - 电阻-电容-电感", Origin Footprint="R 0201_L", OriginFootprint 2="R 0402_L", OriginFootprint 3="R 0805_L", OriginFootprint 4="R 1206_L", OriginFootprint 5="R 1210_L", OriginFootprint 6="R 1812_L", OriginFootprint 7="R 2010_L", OriginFootprint 8="R 2512_L", OriginFootprint 9="R 0201_M", OriginFootprint 10="R 0402_M", OriginFootprint 11="R 0603_M", OriginFootprint 12="R 0805_M", OriginFootprint 13="R 1206_M", OriginFootprint 14="R 1210_M", OriginFootprint 15="R 1812_M", OriginFootprint 16="R 2010_M", OriginFootprint 17="R 2512_M", OriginModelName="R 0603", SymbolName=R, UniqueId=a8dad4614b19f40e, 封装库来自淘宝卖家 ID：黄晶宝石=其他店铺购入均为盗版，不享受售后技术支持服务，请立即申请退款, 版权归属="来自淘宝 ID：黄晶宝石", 联系售后=https://shop463601444.taobao.com
  R252: AddInBom=yes, DesignItemID=R, Device=R, FootprintName="R 0603_L", LibraryName="0.1 - 电阻-电容-电感", Origin Footprint="R 0201_L", OriginFootprint 2="R 0402_L", OriginFootprint 3="R 0805_L", OriginFootprint 4="R 1206_L", OriginFootprint 5="R 1210_L", OriginFootprint 6="R 1812_L", OriginFootprint 7="R 2010_L", OriginFootprint 8="R 2512_L", OriginFootprint 9="R 0201_M", OriginFootprint 10="R 0402_M", OriginFootprint 11="R 0603_M", OriginFootprint 12="R 0805_M", OriginFootprint 13="R 1206_M", OriginFootprint 14="R 1210_M", OriginFootprint 15="R 1812_M", OriginFootprint 16="R 2010_M", OriginFootprint 17="R 2512_M", OriginModelName="R 0603", SymbolName=R, UniqueId=09a288aa9d6e3d92, 封装库来自淘宝卖家 ID：黄晶宝石=其他店铺购入均为盗版，不享受售后技术支持服务，请立即申请退款, 版权归属="来自淘宝 ID：黄晶宝石", 联系售后=https://shop463601444.taobao.com
  R256: AddInBom=yes, DesignItemID=R, Device=R, FootprintName="R 0603_L", LibraryName="0.1 - 电阻-电容-电感", Origin Footprint="R 0201_L", OriginFootprint 2="R 0402_L", OriginFootprint 3="R 0805_L", OriginFootprint 4="R 1206_L", OriginFootprint 5="R 1210_L", OriginFootprint 6="R 1812_L", OriginFootprint 7="R 2010_L", OriginFootprint 8="R 2512_L", OriginFootprint 9="R 0201_M", OriginFootprint 10="R 0402_M", OriginFootprint 11="R 0603_M", OriginFootprint 12="R 0805_M", OriginFootprint 13="R 1206_M", OriginFootprint 14="R 1210_M", OriginFootprint 15="R 1812_M", OriginFootprint 16="R 2010_M", OriginFootprint 17="R 2512_M", OriginModelName="R 0603", SymbolName=R, UniqueId=7c41b6516f1c60a6, 封装库来自淘宝卖家 ID：黄晶宝石=其他店铺购入均为盗版，不享受售后技术支持服务，请立即申请退款, 版权归属="来自淘宝 ID：黄晶宝石", 联系售后=https://shop463601444.taobao.com
  R258: AddInBom=yes, DesignItemID=R, Device=R, FootprintName="R 0603_L", LibraryName="0.1 - 电阻-电容-电感", Origin Footprint="R 0201_L", OriginFootprint 2="R 0402_L", OriginFootprint 3="R 0805_L", OriginFootprint 4="R 1206_L", OriginFootprint 5="R 1210_L", OriginFootprint 6="R 1812_L", OriginFootprint 7="R 2010_L", OriginFootprint 8="R 2512_L", OriginFootprint 9="R 0201_M", OriginFootprint 10="R 0402_M", OriginFootprint 11="R 0603_M", OriginFootprint 12="R 0805_M", OriginFootprint 13="R 1206_M", OriginFootprint 14="R 1210_M", OriginFootprint 15="R 1812_M", OriginFootprint 16="R 2010_M", OriginFootprint 17="R 2512_M", OriginModelName="R 0603", SymbolName=R, UniqueId=127bceab6ada68c7, 封装库来自淘宝卖家 ID：黄晶宝石=其他店铺购入均为盗版，不享受售后技术支持服务，请立即申请退款, 版权归属="来自淘宝 ID：黄晶宝石", 联系售后=https://shop463601444.taobao.com
  R259: AddInBom=yes, DesignItemID=R, Device=R, FootprintName="R 0603_L", LibraryName="0.1 - 电阻-电容-电感", Origin Footprint="R 0201_L", OriginFootprint 2="R 0402_L", OriginFootprint 3="R 0805_L", OriginFootprint 4="R 1206_L", OriginFootprint 5="R 1210_L", OriginFootprint 6="R 1812_L", OriginFootprint 7="R 2010_L", OriginFootprint 8="R 2512_L", OriginFootprint 9="R 0201_M", OriginFootprint 10="R 0402_M", OriginFootprint 11="R 0603_M", OriginFootprint 12="R 0805_M", OriginFootprint 13="R 1206_M", OriginFootprint 14="R 1210_M", OriginFootprint 15="R 1812_M", OriginFootprint 16="R 2010_M", OriginFootprint 17="R 2512_M", OriginModelName="R 0603", SymbolName=R, UniqueId=70403c1b3b132533, 封装库来自淘宝卖家 ID：黄晶宝石=其他店铺购入均为盗版，不享受售后技术支持服务，请立即申请退款, 版权归属="来自淘宝 ID：黄晶宝石", 联系售后=https://shop463601444.taobao.com
  R260: AddInBom=yes, DesignItemID=R, Device=R, FootprintName="R 0603_L", LibraryName="0.1 - 电阻-电容-电感", Origin Footprint="R 0201_L", OriginFootprint 2="R 0402_L", OriginFootprint 3="R 0805_L", OriginFootprint 4="R 1206_L", OriginFootprint 5="R 1210_L", OriginFootprint 6="R 1812_L", OriginFootprint 7="R 2010_L", OriginFootprint 8="R 2512_L", OriginFootprint 9="R 0201_M", OriginFootprint 10="R 0402_M", OriginFootprint 11="R 0603_M", OriginFootprint 12="R 0805_M", OriginFootprint 13="R 1206_M", OriginFootprint 14="R 1210_M", OriginFootprint 15="R 1812_M", OriginFootprint 16="R 2010_M", OriginFootprint 17="R 2512_M", OriginModelName="R 0603", SymbolName=R, UniqueId=c7fcac2dc179deab, 封装库来自淘宝卖家 ID：黄晶宝石=其他店铺购入均为盗版，不享受售后技术支持服务，请立即申请退款, 版权归属="来自淘宝 ID：黄晶宝石", 联系售后=https://shop463601444.taobao.com
  R261: AddInBom=yes, DesignItemID=R, Device=R, FootprintName="R 0603_L", LibraryName="0.1 - 电阻-电容-电感", Origin Footprint="R 0201_L", OriginFootprint 2="R 0402_L", OriginFootprint 3="R 0805_L", OriginFootprint 4="R 1206_L", OriginFootprint 5="R 1210_L", OriginFootprint 6="R 1812_L", OriginFootprint 7="R 2010_L", OriginFootprint 8="R 2512_L", OriginFootprint 9="R 0201_M", OriginFootprint 10="R 0402_M", OriginFootprint 11="R 0603_M", OriginFootprint 12="R 0805_M", OriginFootprint 13="R 1206_M", OriginFootprint 14="R 1210_M", OriginFootprint 15="R 1812_M", OriginFootprint 16="R 2010_M", OriginFootprint 17="R 2512_M", OriginModelName="R 0603", SymbolName=R, UniqueId=3f1747bc7cd0165c, 封装库来自淘宝卖家 ID：黄晶宝石=其他店铺购入均为盗版，不享受售后技术支持服务，请立即申请退款, 版权归属="来自淘宝 ID：黄晶宝石", 联系售后=https://shop463601444.taobao.com
  R262: AddInBom=yes, DesignItemID=R, Device=R, FootprintName="R 0603_L", LibraryName="0.1 - 电阻-电容-电感", Origin Footprint="R 0201_L", OriginFootprint 2="R 0402_L", OriginFootprint 3="R 0805_L", OriginFootprint 4="R 1206_L", OriginFootprint 5="R 1210_L", OriginFootprint 6="R 1812_L", OriginFootprint 7="R 2010_L", OriginFootprint 8="R 2512_L", OriginFootprint 9="R 0201_M", OriginFootprint 10="R 0402_M", OriginFootprint 11="R 0603_M", OriginFootprint 12="R 0805_M", OriginFootprint 13="R 1206_M", OriginFootprint 14="R 1210_M", OriginFootprint 15="R 1812_M", OriginFootprint 16="R 2010_M", OriginFootprint 17="R 2512_M", OriginModelName="R 0603", SymbolName=R, UniqueId=086d1dd8ac2c5fca, 封装库来自淘宝卖家 ID：黄晶宝石=其他店铺购入均为盗版，不享受售后技术支持服务，请立即申请退款, 版权归属="来自淘宝 ID：黄晶宝石", 联系售后=https://shop463601444.taobao.com
  R263: AddInBom=yes, DesignItemID=R, Device=R, FootprintName="R 0603_L", LibraryName="0.1 - 电阻-电容-电感", Origin Footprint="R 0201_L", OriginFootprint 2="R 0402_L", OriginFootprint 3="R 0805_L", OriginFootprint 4="R 1206_L", OriginFootprint 5="R 1210_L", OriginFootprint 6="R 1812_L", OriginFootprint 7="R 2010_L", OriginFootprint 8="R 2512_L", OriginFootprint 9="R 0201_M", OriginFootprint 10="R 0402_M", OriginFootprint 11="R 0603_M", OriginFootprint 12="R 0805_M", OriginFootprint 13="R 1206_M", OriginFootprint 14="R 1210_M", OriginFootprint 15="R 1812_M", OriginFootprint 16="R 2010_M", OriginFootprint 17="R 2512_M", OriginModelName="R 0603", SymbolName=R, UniqueId=0b6333695f921556, 封装库来自淘宝卖家 ID：黄晶宝石=其他店铺购入均为盗版，不享受售后技术支持服务，请立即申请退款, 版权归属="来自淘宝 ID：黄晶宝石", 联系售后=https://shop463601444.taobao.com
  R264: AddInBom=yes, DesignItemID=R, Device=R, FootprintName="R 0603_L", LibraryName="0.1 - 电阻-电容-电感", Origin Footprint="R 0201_L", OriginFootprint 2="R 0402_L", OriginFootprint 3="R 0805_L", OriginFootprint 4="R 1206_L", OriginFootprint 5="R 1210_L", OriginFootprint 6="R 1812_L", OriginFootprint 7="R 2010_L", OriginFootprint 8="R 2512_L", OriginFootprint 9="R 0201_M", OriginFootprint 10="R 0402_M", OriginFootprint 11="R 0603_M", OriginFootprint 12="R 0805_M", OriginFootprint 13="R 1206_M", OriginFootprint 14="R 1210_M", OriginFootprint 15="R 1812_M", OriginFootprint 16="R 2010_M", OriginFootprint 17="R 2512_M", OriginModelName="R 0603", SymbolName=R, UniqueId=9e71ce6b7342da3b, 封装库来自淘宝卖家 ID：黄晶宝石=其他店铺购入均为盗版，不享受售后技术支持服务，请立即申请退款, 版权归属="来自淘宝 ID：黄晶宝石", 联系售后=https://shop463601444.taobao.com
  R265: AddInBom=yes, DesignItemID=R, Device=R, FootprintName="R 0603_L", LibraryName="0.1 - 电阻-电容-电感", Origin Footprint="R 0201_L", OriginFootprint 2="R 0402_L", OriginFootprint 3="R 0805_L", OriginFootprint 4="R 1206_L", OriginFootprint 5="R 1210_L", OriginFootprint 6="R 1812_L", OriginFootprint 7="R 2010_L", OriginFootprint 8="R 2512_L", OriginFootprint 9="R 0201_M", OriginFootprint 10="R 0402_M", OriginFootprint 11="R 0603_M", OriginFootprint 12="R 0805_M", OriginFootprint 13="R 1206_M", OriginFootprint 14="R 1210_M", OriginFootprint 15="R 1812_M", OriginFootprint 16="R 2010_M", OriginFootprint 17="R 2512_M", OriginModelName="R 0603", SymbolName=R, UniqueId=79cad709e969d650, 封装库来自淘宝卖家 ID：黄晶宝石=其他店铺购入均为盗版，不享受售后技术支持服务，请立即申请退款, 版权归属="来自淘宝 ID：黄晶宝石", 联系售后=https://shop463601444.taobao.com
  R266: AddInBom=yes, DesignItemID=R, Device=R, FootprintName="R 0603_L", LibraryName="0.1 - 电阻-电容-电感", Origin Footprint="R 0201_L", OriginFootprint 2="R 0402_L", OriginFootprint 3="R 0805_L", OriginFootprint 4="R 1206_L", OriginFootprint 5="R 1210_L", OriginFootprint 6="R 1812_L", OriginFootprint 7="R 2010_L", OriginFootprint 8="R 2512_L", OriginFootprint 9="R 0201_M", OriginFootprint 10="R 0402_M", OriginFootprint 11="R 0603_M", OriginFootprint 12="R 0805_M", OriginFootprint 13="R 1206_M", OriginFootprint 14="R 1210_M", OriginFootprint 15="R 1812_M", OriginFootprint 16="R 2010_M", OriginFootprint 17="R 2512_M", OriginModelName="R 0603", SymbolName=R, UniqueId=d1ab67904d4ab3e5, 封装库来自淘宝卖家 ID：黄晶宝石=其他店铺购入均为盗版，不享受售后技术支持服务，请立即申请退款, 版权归属="来自淘宝 ID：黄晶宝石", 联系售后=https://shop463601444.taobao.com
  R267: AddInBom=yes, DesignItemID=R, Device=R, FootprintName="R 0603_L", LibraryName="0.1 - 电阻-电容-电感", Origin Footprint="R 0201_L", OriginFootprint 2="R 0402_L", OriginFootprint 3="R 0805_L", OriginFootprint 4="R 1206_L", OriginFootprint 5="R 1210_L", OriginFootprint 6="R 1812_L", OriginFootprint 7="R 2010_L", OriginFootprint 8="R 2512_L", OriginFootprint 9="R 0201_M", OriginFootprint 10="R 0402_M", OriginFootprint 11="R 0603_M", OriginFootprint 12="R 0805_M", OriginFootprint 13="R 1206_M", OriginFootprint 14="R 1210_M", OriginFootprint 15="R 1812_M", OriginFootprint 16="R 2010_M", OriginFootprint 17="R 2512_M", OriginModelName="R 0603", SymbolName=R, UniqueId=f7952e9f9cd6773b, 封装库来自淘宝卖家 ID：黄晶宝石=其他店铺购入均为盗版，不享受售后技术支持服务，请立即申请退款, 版权归属="来自淘宝 ID：黄晶宝石", 联系售后=https://shop463601444.taobao.com
  R268: AddInBom=yes, DesignItemID=R, Device=R, FootprintName="R 0603_L", LibraryName="0.1 - 电阻-电容-电感", Origin Footprint="R 0201_L", OriginFootprint 2="R 0402_L", OriginFootprint 3="R 0805_L", OriginFootprint 4="R 1206_L", OriginFootprint 5="R 1210_L", OriginFootprint 6="R 1812_L", OriginFootprint 7="R 2010_L", OriginFootprint 8="R 2512_L", OriginFootprint 9="R 0201_M", OriginFootprint 10="R 0402_M", OriginFootprint 11="R 0603_M", OriginFootprint 12="R 0805_M", OriginFootprint 13="R 1206_M", OriginFootprint 14="R 1210_M", OriginFootprint 15="R 1812_M", OriginFootprint 16="R 2010_M", OriginFootprint 17="R 2512_M", OriginModelName="R 0603", SymbolName=R, UniqueId=ee084f684bde39fa, 封装库来自淘宝卖家 ID：黄晶宝石=其他店铺购入均为盗版，不享受售后技术支持服务，请立即申请退款, 版权归属="来自淘宝 ID：黄晶宝石", 联系售后=https://shop463601444.taobao.com
  R269: AddInBom=yes, DesignItemID=R, Device=R, FootprintName="R 0603_L", LibraryName="0.1 - 电阻-电容-电感", Origin Footprint="R 0201_L", OriginFootprint 2="R 0402_L", OriginFootprint 3="R 0805_L", OriginFootprint 4="R 1206_L", OriginFootprint 5="R 1210_L", OriginFootprint 6="R 1812_L", OriginFootprint 7="R 2010_L", OriginFootprint 8="R 2512_L", OriginFootprint 9="R 0201_M", OriginFootprint 10="R 0402_M", OriginFootprint 11="R 0603_M", OriginFootprint 12="R 0805_M", OriginFootprint 13="R 1206_M", OriginFootprint 14="R 1210_M", OriginFootprint 15="R 1812_M", OriginFootprint 16="R 2010_M", OriginFootprint 17="R 2512_M", OriginModelName="R 0603", SymbolName=R, UniqueId=2eb3813281b987ab, 封装库来自淘宝卖家 ID：黄晶宝石=其他店铺购入均为盗版，不享受售后技术支持服务，请立即申请退款, 版权归属="来自淘宝 ID：黄晶宝石", 联系售后=https://shop463601444.taobao.com
  R270: AddInBom=yes, DesignItemID=R, Device=R, FootprintName="R 0603_L", LibraryName="0.1 - 电阻-电容-电感", Origin Footprint="R 0201_L", OriginFootprint 2="R 0402_L", OriginFootprint 3="R 0805_L", OriginFootprint 4="R 1206_L", OriginFootprint 5="R 1210_L", OriginFootprint 6="R 1812_L", OriginFootprint 7="R 2010_L", OriginFootprint 8="R 2512_L", OriginFootprint 9="R 0201_M", OriginFootprint 10="R 0402_M", OriginFootprint 11="R 0603_M", OriginFootprint 12="R 0805_M", OriginFootprint 13="R 1206_M", OriginFootprint 14="R 1210_M", OriginFootprint 15="R 1812_M", OriginFootprint 16="R 2010_M", OriginFootprint 17="R 2512_M", OriginModelName="R 0603", SymbolName=R, UniqueId=fa394caafc8878d8, 封装库来自淘宝卖家 ID：黄晶宝石=其他店铺购入均为盗版，不享受售后技术支持服务，请立即申请退款, 版权归属="来自淘宝 ID：黄晶宝石", 联系售后=https://shop463601444.taobao.com